# EAGLE board stm32_carrier (EAGLE 9.6.2)
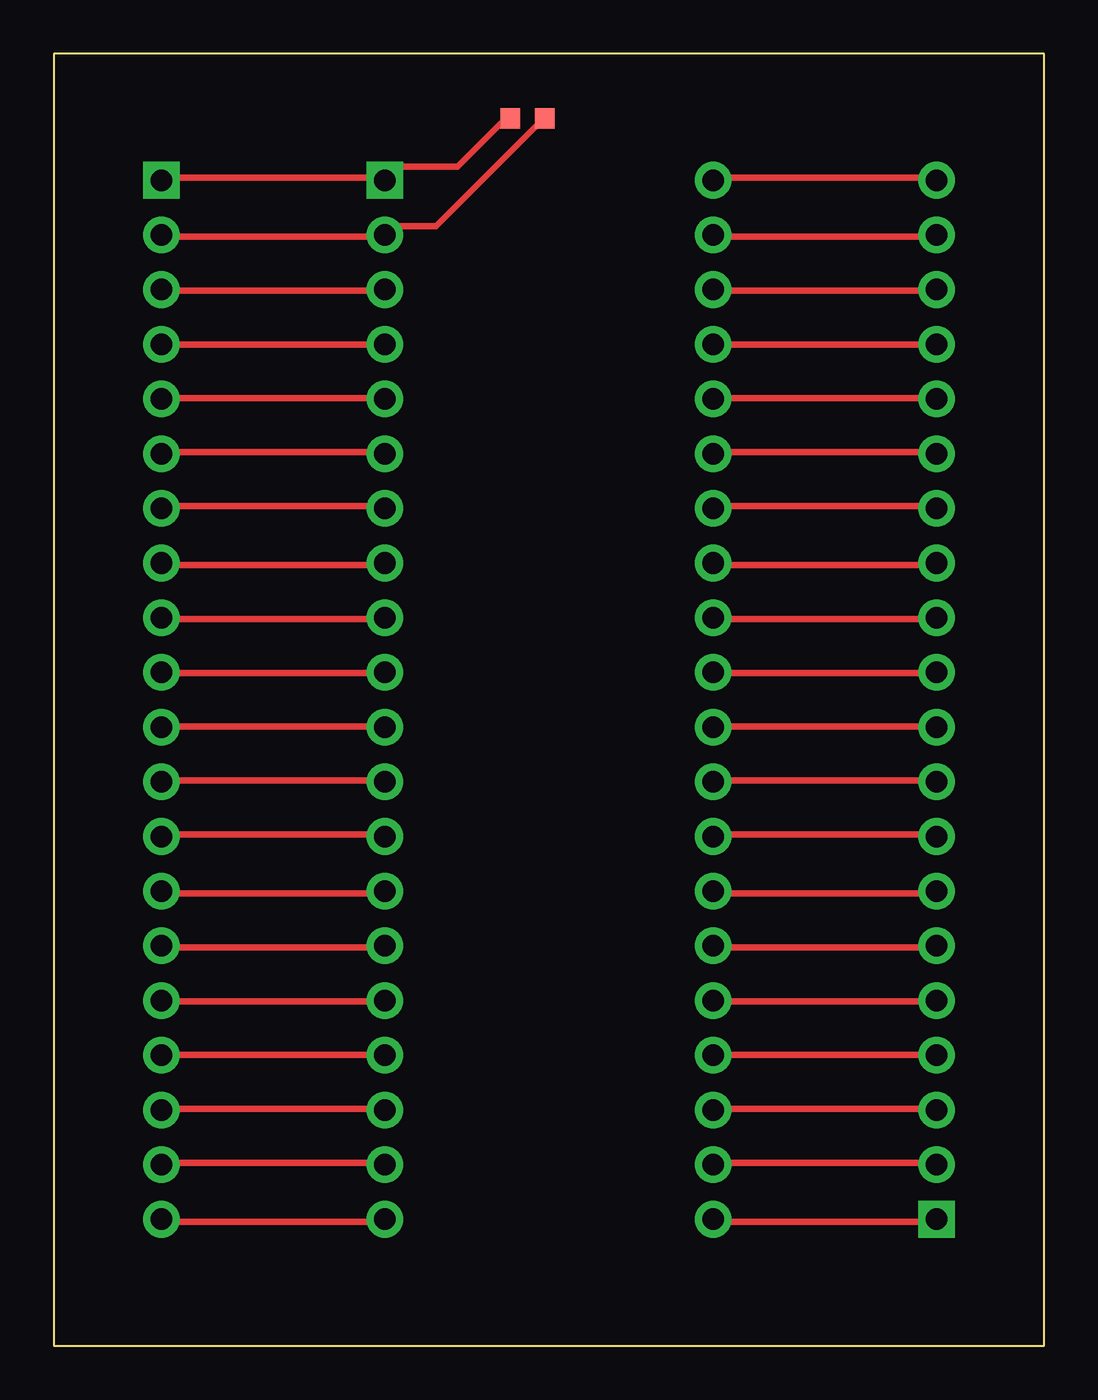
[diagram p0: board, top side]

Size 46 x 60 mm. Coordinates in mm from the lower left corner, seen from the top.
Outline: 0,0 46,0 46,60 0,60 0,0
Copper layers used: Top
Design rules "eh3d-kit": minimum track width 0.15mm, minimum drill 0.3mm, track to track 0.15mm, track to pad 0.15mm, pad to pad 0.15mm, via to via 0.15mm, smd to smd 0.15mm, copper to edge 0.3mm, drill to drill 0.25mm, minimum pad ring 0.15mm, minimum via ring 0.15mm

## Footprints (pad centres in the part's own frame; a part is rotated, then mirrored left to right if it is on the bottom)
CHIP-0603 = smd 0.9 x 0.95: 1 -0.8,0; 2 0.8,0
HDR-1X20 = drill 1 pad 1.7 square: 1 -24.13,0 | drill 1 pad 1.7: 2 -21.59,0; 3 -19.05,0; 4 -16.51,0; 5 -13.97,0; 6 -11.43,0; 7 -8.89,0; 8 -6.35,0; 9 -3.81,0; 10 -1.27,0; 11 1.27,0; 12 3.81,0; 13 6.35,0; 14 8.89,0; 15 11.43,0; 16 13.97,0; 17 16.51,0; 18 19.05,0; 19 21.59,0; 20 24.13,0
MODULE-STM32-TYPE = drill 1 pad 1.7 square: 1 -7.62,24.13 | drill 1 pad 1.7: 2 -7.62,21.59; 3 -7.62,19.05; 4 -7.62,16.51; 5 -7.62,13.97; 6 -7.62,11.43; 7 -7.62,8.89; 8 -7.62,6.35; 9 -7.62,3.81; 10 -7.62,1.27; 11 -7.62,-1.27; 12 -7.62,-3.81; 13 -7.62,-6.35; 14 -7.62,-8.89; 15 -7.62,-11.43; 16 -7.62,-13.97; 17 -7.62,-16.51; 18 -7.62,-19.05; 19 -7.62,-21.59; 20 -7.62,-24.13; 21 7.62,-24.13; 22 7.62,-21.59; 23 7.62,-19.05; 24 7.62,-16.51; 25 7.62,-13.97; 26 7.62,-11.43; 27 7.62,-8.89; 28 7.62,-6.35; 29 7.62,-3.81; 30 7.62,-1.27; 31 7.62,1.27; 32 7.62,3.81; 33 7.62,6.35; 34 7.62,8.89; 35 7.62,11.43; 36 7.62,13.97; 37 7.62,16.51; 38 7.62,19.05; 39 7.62,21.59; 40 7.62,24.13

## Placement (x,y rotation side)
C1  100n  [CHIP-0603]  22,57 0 top
J1  LEFT  [HDR-1X20]  5,30 270 top
J2  RIGHT  [HDR-1X20]  41,30 90 top
M1  STM32-TYPE  [MODULE-STM32-TYPE]  23,30 0 top

## Library data of the parts
C1 J1 J2 M1 = eh3d-kit

## Nets
GND: C1.2 J1.2 M1.2
IO3: J1.3 M1.3
IO4: J1.4 M1.4
IO5: J1.5 M1.5
IO6: J1.6 M1.6
IO7: J1.7 M1.7
IO8: J1.8 M1.8
IO9: J1.9 M1.9
IO10: J1.10 M1.10
IO11: J1.11 M1.11
IO12: J1.12 M1.12
IO13: J1.13 M1.13
IO14: J1.14 M1.14
IO15: J1.15 M1.15
IO16: J1.16 M1.16
IO17: J1.17 M1.17
IO18: J1.18 M1.18
IO19: J1.19 M1.19
IO20: J1.20 M1.20
IO21: J2.1 M1.21
IO22: J2.2 M1.22
IO23: J2.3 M1.23
IO24: J2.4 M1.24
IO25: J2.5 M1.25
IO26: J2.6 M1.26
IO27: J2.7 M1.27
IO28: J2.8 M1.28
IO29: J2.9 M1.29
IO30: J2.10 M1.30
IO31: J2.11 M1.31
IO32: J2.12 M1.32
IO33: J2.13 M1.33
IO34: J2.14 M1.34
IO35: J2.15 M1.35
IO36: J2.16 M1.36
IO37: J2.17 M1.37
IO38: J2.18 M1.38
IO39: J2.19 M1.39
IO40: J2.20 M1.40
V3V3: C1.1 J1.1 M1.1

## Tracks (layer width: path | path; a pad name or v marks a point on that pad's centre or on a via)
GND
  Top 0.3: C1.2 22.25,56.5 17.75,52 16,52 M1.2 15,51.5 5.5,51.5 J1.2
IO3
  Top 0.3: J1.3 5.5,49 15,49 M1.3
IO4
  Top 0.3: J1.4 5.5,46.5 15,46.5 M1.4
IO5
  Top 0.3: J1.5 5.5,44 15,44 M1.5
IO6
  Top 0.3: J1.6 5.5,41.5 15,41.5 M1.6
IO7
  Top 0.3: J1.7 5.5,39 15,39 M1.7
IO8
  Top 0.3: J1.8 5.5,36.25 15,36.25 M1.8
IO9
  Top 0.3: J1.9 5.5,33.75 15,33.75 M1.9
IO10
  Top 0.3: J1.10 5.5,31.25 15,31.25 M1.10
IO11
  Top 0.3: J1.11 5.5,28.75 15,28.75 M1.11
IO12
  Top 0.3: J1.12 5.5,26.25 15,26.25 M1.12
IO13
  Top 0.3: J1.13 5.5,23.75 15,23.75 M1.13
IO14
  Top 0.3: J1.14 5.5,21 15,21 M1.14
IO15
  Top 0.3: J1.15 5.5,18.5 15,18.5 M1.15
IO16
  Top 0.3: J1.16 5.5,16 15,16 M1.16
IO17
  Top 0.3: J1.17 5.5,13.5 15,13.5 M1.17
IO18
  Top 0.3: J1.18 5.5,11 15,11 M1.18
IO19
  Top 0.3: J1.19 5.5,8.5 15,8.5 M1.19
IO20
  Top 0.3: J1.20 5.5,5.75 15,5.75 M1.20
IO21
  Top 0.3: J2.1 40.5,5.75 31,5.75 M1.21
IO22
  Top 0.3: J2.2 40.5,8.5 31,8.5 M1.22
IO23
  Top 0.3: J2.3 40.5,11 31,11 M1.23
IO24
  Top 0.3: J2.4 40.5,13.5 31,13.5 M1.24
IO25
  Top 0.3: J2.5 40.5,16 31,16 M1.25
IO26
  Top 0.3: J2.6 40.5,18.5 31,18.5 M1.26
IO27
  Top 0.3: J2.7 40.5,21 31,21 M1.27
IO28
  Top 0.3: J2.8 40.5,23.75 31,23.75 M1.28
IO29
  Top 0.3: J2.9 40.5,26.25 31,26.25 M1.29
IO30
  Top 0.3: J2.10 40.5,28.75 31,28.75 M1.30
IO31
  Top 0.3: J2.11 40.5,31.25 31,31.25 M1.31
IO32
  Top 0.3: J2.12 40.5,33.75 31,33.75 M1.32
IO33
  Top 0.3: J2.13 40.5,36.25 31,36.25 M1.33
IO34
  Top 0.3: J2.14 40.5,39 31,39 M1.34
IO35
  Top 0.3: J2.15 40.5,41.5 31,41.5 M1.35
IO36
  Top 0.3: J2.16 40.5,44 31,44 M1.36
IO37
  Top 0.3: J2.17 40.5,46.5 31,46.5 M1.37
IO38
  Top 0.3: J2.18 40.5,49 31,49 M1.38
IO39
  Top 0.3: J2.19 40.5,51.5 31,51.5 M1.39
IO40
  Top 0.3: J2.20 40.5,54.25 31,54.25 M1.40
V3V3
  Top 0.3: C1.1 20.75,56.75 18.75,54.75 16,54.75 M1.1 15,54.25 5.5,54.25 J1.1